# Altium PCB ePBR20_ACU_Power_rev0.PcbDoc (part 2 of 3)
Units mil, origin at the board's own origin, x right, y up, seen from the top; angles counter-clockwise.
Board outline 7475 x 3770 mil, 2 copper layers (Top Layer, Bottom Layer); 143 components, 136 nets, 557 pads, 1444 vias.
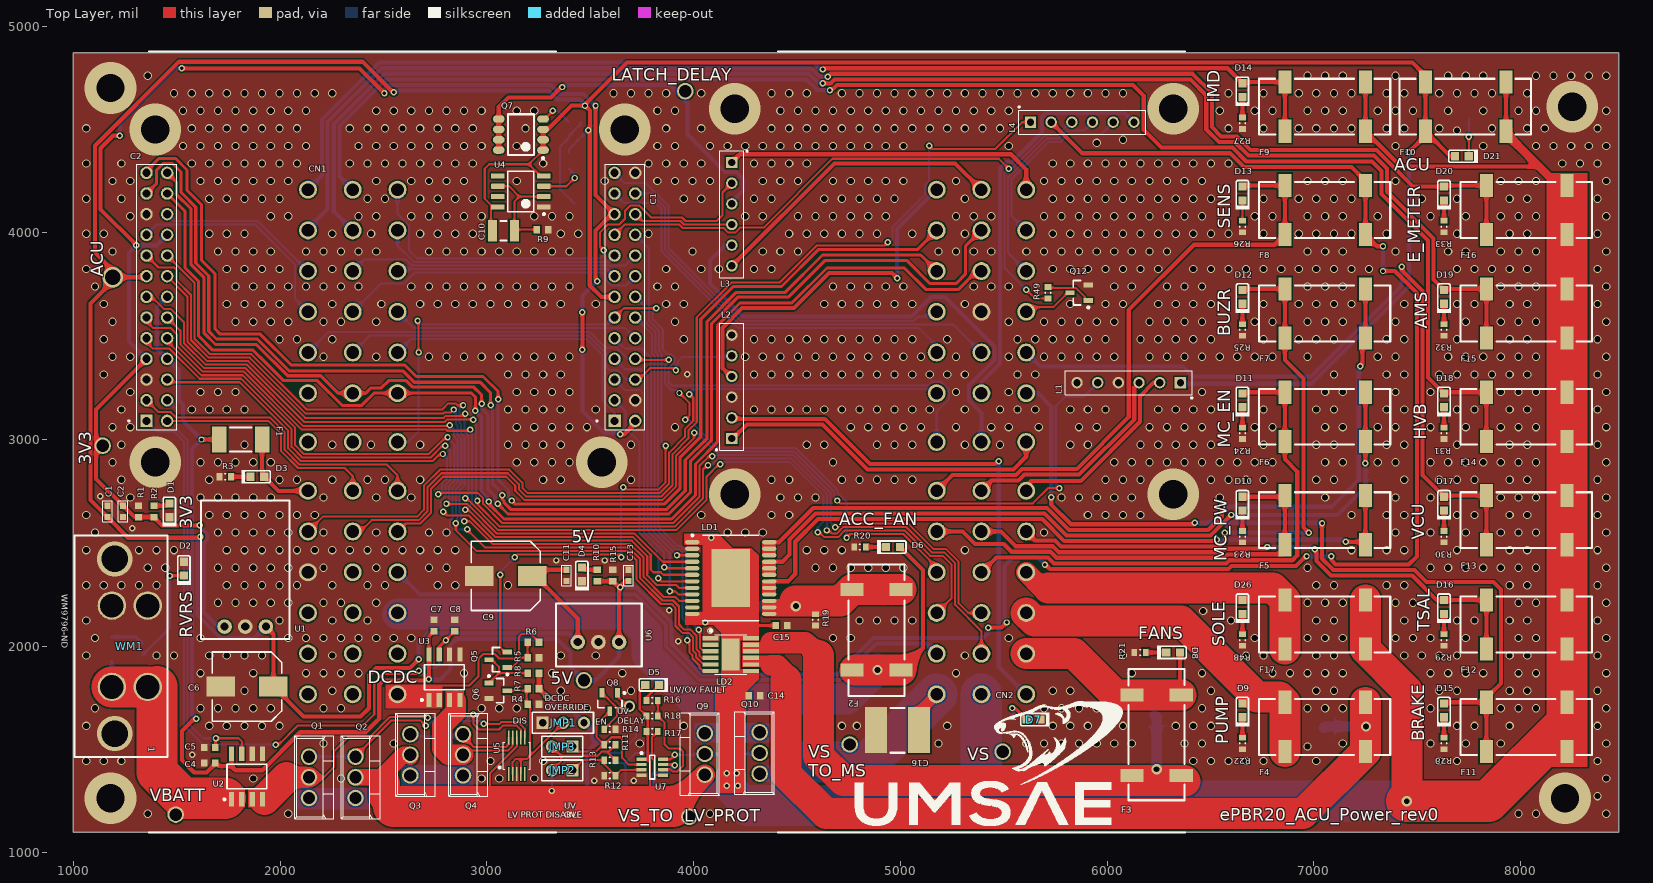
[diagram p0: Top Layer view]

## Part data (continued)
U7: library part CMP-0474-00861-1, "UV, OV and Reverse Supply Protection Controller, 2.5 to 34 V Vin, 8-pin SOT23 (TS8-8), -40 to 85 degC, Pb-Free, Mini Tape and Reel", Extended Temp="C, I, H", Manufacturer="Linear Technology", Power Good=no, Supplier Part Number 1=LTC4365ITS8#TRMPBFCT-ND, Active Limiting=no, Circuit Breakers(#)=1, Code_JEDEC=MO-193, ComponentLink1Description="Manufacturer URL", ComponentLink1URL=http://www.linear.com/, ComponentLink2Description=Datasheet, ComponentLink2URL=http://cds.linear.com/docs/en/datasheet/4365f.pdf, ComponentLink3Description="Package Specification", ComponentLink3URL=http://cds.linear.com/docs/en/packaging/SOT_8_05-08-1637.pdf, Fast Comparator=no, Fault=yes, Foldback=no, Mounting Technology="Surface Mount", PackageDescription="8-Pin Plastic TSOT-23, Body 2.9 x 1.63 mm, Pitch 0.65 mm", PackageReference=TS8-8, PackageVersion="Rev. A, 08/2010", Packing="Mini Tape and Reel", PartNumber=LTC4365ITS8#TRMPBF, Reset=no, RoHS=TRUE, Supplier 1=Digi-Key, Vin Range="2.5 to 34 V"
WM1: library part "Header 2", "Header, 2-Pin", LatestRevisionDate=17-Jul-2002, LatestRevisionNote="Re-released for DXP Platform.", Publisher="Altium Limited", Supplier 1=Digi-Key, Supplier 2=Digi-Key, Supplier Part Number 2=WM9796-ND

## Free pads (board coordinates)
  round 80 hole 60: 9(1142,2970) 9(1495,1185.95) 9(3470,1835) 9(3960,4685) 9(3980,1175) 9(4755,1525) 9(5495,1490)

## Via types
v1: diameter 40, hole 30, Top Layer to Bottom Layer, 1281 vias
v2: diameter 31, hole 17, Top Layer to Bottom Layer, 142 vias
v3: diameter 250, hole 137, Top Layer to Bottom Layer, 12 vias
v4: diameter 50, hole 28, Top Layer to Bottom Layer, 5 vias
v5: diameter 170, hole 128, Top Layer to Bottom Layer, 2 vias
v6: diameter 55, hole 35, Top Layer to Bottom Layer, 1 vias
v7: diameter 100, hole 75, Top Layer to Bottom Layer, 1 vias

## Nets (pads, with @x,y where several pads share a name; then routed paths per layer and width w, separated by ;. In a path a pad name is that pad's centre, name@x,y a point inside that pad or via, vN(x,y) a via of type N, cw(c..) or ccw(c..) an arc to the next point about the centre after c; other vN are vias at no path point)
3V3: C1.A11 C1.B1 C2.2 C2.A4 C2.B10 pad.9@1142,2970 R1.2 R2.1 U1.3 | length 7803.4
  Top Layer w20: v2(1225,4470) 1193.18,4470 1132,4408.82 1132,4113 v2(1305,3940) ; C2.A4@1355,3390 1110,3145 1110,2810.06 C2.2@1240,2680.06 1295.12,2624.94 R1.2@1315,2624.94 1315.06,2625 1389.94,2625 R2.1@1390,2624.94 1429.94,2585 v2(1611,2585) ; v2(1525,4795) 2385,4795 v2(2505,4675) ; v2(3462.4,3435) v2(3462.4,3615) ; v2(3526,4614) 3526,4182.02 C1.A11@3618.02,4090 3604.56,4090 3526,4011.44 3526,3774 v2(3535,3765) ; v2(3645,3025) 3665,3025 3718.02,3078.02 C1.B1@3718.02,3090
  Bottom Layer w20: v2(1225,4470) 1225,4529.82 1490.18,4795 v2(1525,4795) ; C2.A4@1354.02,3390 1270,3474.02 1270,3905 v2(1305,3940) 1404.02,3940 C2.B10@1454.02,3990 ; v2(1611,2585) 1611,2579.96 1647.5,2543.46 1647.5,2516.54 1628.5,2497.54 1628.5,2164.68 1698.18,2095 U1.3@1731.54,2095 ; v2(2505,4675) 2505,4695.45 2524.55,4715 3310,4715 3332.5,4692.5 3332.5,4691.54 3352.04,4672 3468,4672 v2(3526,4614) ; v2(3462.4,3435) 3462.4,3137.6 3568,3032 3638,3032 v2(3645,3025) ; v2(3462.4,3615) 3462.4,3697.29 3530.11,3765 v2(3535,3765)
3V3_ON: D1.1 R2.2 | length 79.6
  Top Layer w20: R2.2@1390,2680.06 1453.79,2680.06 D1.1@1465,2691.27
5V: C2.B4 C2.B7 C4.2 C7.2 C13.2 F1.1 F8.1 L4.2 pad.9@3470,1835 R10.1 R15.2 U2.8 U3.8 U6.3 | length 14284.5
  Top Layer w15: U3.8@2720,1960.24 2720,2047.44 C7.2@2745,2072.44
  Top Layer w20: v2@1581.59,1646.59 1525,1590 1525,1450 1585,1390 1645,1390 1687.56,1432.56 C4.2@1687.56,1435 1702.56,1420 1765,1420 ; v2(1620,3000) F1.1@1707.05,3000 ; U2.8@1765,1480.24 1765,1420 ; U3.8@2720,1960.24 v2(2720,1840) 2706.3,1840 2701.3,1835 2500,1835 2480,1815 2480,1650 2465,1635 2413.92,1583.92 2097.82,1583.92 1913.9,1400 1785,1400 1765,1420 ; R10.1@3535,2314.94 R15.2@3610,2314.94 v2@3640,2284.94 ; U6.3@3640,2020 v2@3640,2284.94 ; C13.2@3685,2315 3670.06,2315 v2@3640,2284.94 ; v2(5425,2090) 5490,2090 v2(5515,2115) ; v2(5700,2395) 5702.98,2395 5723.98,2374 6587.7,2374 6602.7,2389 6914.5,2389 6960.5,2435 v2(6965,2435) ; L4.2@5730,4535 5880,4385 6595.45,4385 6662.45,4318 7182,4318 7249.88,4250.12 F8.1@7249.88,4228.9 F8.1@7249.88,3991.1 7305.98,3935 v2(7335,3935) ; v2(7085,2435) 7085,2416.37 7105.83,2395.53 7459.53,2395.53 7499,2435 7499,3707.82 7391.82,3815 v2(7335,3815)
  Bottom Layer w20: C2.B4@1454.02,3390 1405,3439.02 1405,3640.98 C2.B7@1454.02,3690 ; C2.B4@1455,3390 1510,3335 1510,3190 1530,3170 1530,3090 v2(1620,3000) 1574.5,2954.5 1574.5,1670.5 v2(1595,1650) ; v2(2720,1840) 2775,1840 2825,1890 2825,2006.48 2854.52,2036 3339,2036 3405,1970 3405,1900 pad.9@3470,1835 3524.61,1835 3640,1950.39 U6.3@3640,2020 ; v2(3645,2285) 3723.29,2285 3894,2114.29 3894,2009.92 4039.92,1864 4695.71,1864 4871.27,2039.56 5399.56,2039.56 5425,2065 v2(5425,2090) ; v2(5515,2115) 5503.44,2126.56 5503.44,2388.44 5545,2430 5665,2430 v2(5700,2395) ; v2(6965,2435) v2(7085,2435) ; v2@7335,3814.77 v2(7335,3815) v2(7335,3935)
5V_ON: D4.1 R10.2 | length 79.6
  Top Layer w20: D4.1@3460,2381.27 3471.21,2370.06 R10.2@3535,2370.06
555_OUT: R41.1 U8.3 | length 244.7
  Bottom Layer w10: U8.3@3569.84,1484.65 U8.3@3585.2,1484.65 3645.87,1484.65 3720.98,1559.76 R41.1@3720.98,1622.2
555_OUT_LATCHING: Q11.1 R44.2 U4.3 | length 274
  Top Layer w10: U4.3@3276.22,4225 3385,4225 v2(3425,4265)
  Bottom Layer w10: Q11.1@3387.6,4229.29 3389.29,4229.29 v2(3425,4265) 3425,4282.44 R44.2@3397.44,4310
A\M\S\_\O\K\: CN1.3 L3.2 | length 2281.5
  Top Layer w10: v2(3565,3915.62) 3548,3932.62 3548,4002.33 3585.67,4040 3640,4040 3668.45,4068.45 3668.45,4106.32 3694.25,4132.12 3737.88,4132.12 3796,4074 3944.08,4074 3961.08,4057 4112,4057 4140,4085 4140,4195 L3.2@4185,4240
  Bottom Layer w10: CN1.3@2568.07,4208.47 2568.07,4091.93 2623.38,4036.62 2623.38,3915.62 2663,3876 3548,3876 3565,3893 v2(3565,3915.62)
ACC_FAN_CTRL: C1.A4 LD1.9 | length 1408.4
  Top Layer w10: C1.A4@3618.02,3390 C1.A4@3619,3390 ; v2(3885,2265.76) 3912.51,2265.76 3927,2251.26 LD1.9@3993.98,2251.26
  Bottom Layer w10: C1.A4@3618.02,3390 3668.02,3340 3745,3340 3777.13,3307.87 3777.13,3165.51 3777,3165.38 3777,3114.62 3777.13,3114.49 3777.13,2557.87 3885,2450 v2@3885,2253.39
ACC_FAN_FB: C2.B9 LD1.10 | length 3844.1
  Top Layer w10: C2.B9@1454.02,3890 1586,3758.02 1586,3488.25 1661.25,3413 1861.04,3413 2129.04,3145 2783.98,3145 2813.98,3175 2848.89,3175 2858.89,3165 v2(2885,3165) ; v2(2890,2605) 2917,2605 3028,2494 3694.08,2494 3759,2429.08 3759,2359.93 3758.91,2359.83 3758.91,2336.21 3856.86,2238.26 3911.74,2238.26 3930.24,2219.76 LD1.10@3993.98,2219.76
  Bottom Layer w10: v2(2885,3165) 2869.78,3165 2867.39,3167.39 2867.39,3156.5 2867.5,3156.39 2867.5,3082.5 2875.5,3074.5 2875.5,3029.87 2893.5,3011.87 2893.5,2778.5 2867.5,2752.5 2867.5,2648.61 2875,2641.11 2875,2620 v2(2890,2605)
ACC_FAN_FUSE: D24.2 F2.1 LD1.13 LD1.14 LD1.15 R19.2 | length 766.6
  Top Layer w150: 4490,2220 4711.22,2220 F2.1@4766.1,2274.88 F2.1@5003.9,2274.88
  Bottom Layer w50: D24.2@4265,2194.19 v4(4495,2194.19)
ACC_FAN_PWR: CN1.33 D6.1 F2.2 | length 3521.9
  Top Layer w20: D6.1@4998.46,2480 5110,2368.46 5110,1991.22 F2.2@5003.9,1885.12
  Top Layer w150: F2.2@4780,1885.12 F2.2@5003.9,1885.12
  Bottom Layer w150: CN1.33@2568.07,2155 3685,2155 3775,2065 3775,1960.62 3990.62,1745 4745,1745 v4@4890,1890
  other v4: 4890,1884.97
ACU_PWR: C1.2 C1.A7 C2.A8 C6.1 C9.1 C10.1 C11.2 D21.1 F10.2 L1.1 Q7.1 Q7.2 Q7.3 R43.2 R45.2 U1.1 U4.4 U4.8 U6.1 | length 17769.3
  Top Layer w10: C10.1@3026.85,4010 3020,4016.85 3020,4135 2990,4165 2990,4310 3011.36,4331.36 3203.64,4331.36 ; Q7.1@3272.28,4400 3203.64,4331.36 ; U4.4@3276.22,4275 3260,4275 3203.64,4331.36
  Top Layer w20: C2.A8@1355,3790 C2.A8@1354.02,3790 1349.02,3785 v7@1210,3785 ; v2(1615,2530) 1610,2525 1265,2525 C1.2@1165,2625 1083,2707 1083,3658 1190,3765 v7(1190,3785) v7@1210,3785 ; U1.1@1931.54,2095 1967.95,2058.58 C6.1@1967.95,1805 2112.95,1660 2390,1660 2430,1700 2430,1860.12 2464.88,1895 2628.31,1895 v2(2670,1936.69) ; v2(2550,4680) 2550,4675.96 2398.46,4827.5 1511.54,4827.5 1105,4420.96 1105,3905 1217.5,3792.5 v7@1210,3785 ; C10.1@3026.85,3978.15 C10.1@3026.85,4010 ; C9.1@3220,2340 C9.1@3235,2340 ; C9.1@3265,2375 C9.1@3270,2370 ; Q7.1@3272.28,4400 Q7.2@3272.28,4450 Q7.3@3272.28,4500 3295,4500 3410,4615 v2(3475,4615) 3499,4591 3499,4504 v2(3490,4495) 3498,4487 3498,3746.04 3554.04,3690 C1.A7@3618.02,3690 ; C11.2@3385,2370 C9.1@3270,2370 ; U6.1@3440,2020 3440,2135 C9.1@3235,2340 ; v2@3475,4620 3678,4823 7477,4823 7540.12,4759.88 F10.2@7540.12,4728.9 F10.2@7540.12,4491.1 ; v2(7460,4390) 7540.12,4470.12 F10.2@7540.12,4491.1 ; D21.1@7683.07,4370 7661.22,4370 F10.2@7540.12,4491.1 ; C9.1@3235,2340 3265,2370 C9.1@3270,2370
  Bottom Layer w10: R45.2@3397.44,4385 3397.44,4404.88 R43.2@3452.56,4460 3487.56,4495 v2(3490,4495)
  Bottom Layer w20: v2(1615,2530) 1601.5,2516.5 1601.5,2150.88 1712.38,2040 1876.54,2040 U1.1@1931.54,2095 ; v2(2550,4680) 2558,4688 3298.82,4688 3305.5,4681.32 3305.5,4680.35 3340.85,4645 3450,4645 v2@3475,4620 ; v2(2670,1936.69) 2670,2015 2718,2063 3397,2063 U6.1@3440,2020 ; L1.1@6355,3270 6990,3270 7460,3740 v2(7460,4390)
AIR+_CTRL: C1.B9 CN1.8 | length 1420.9
  Bottom Layer w10: CN1.8@2351.54,3814.77 2406.84,3870.08 2609.92,3870.08 2638,3842 3670.02,3842 C1.B9@3718.02,3890
AIR+_FB: C1.B5 CN1.12 | length 1202.9
  Bottom Layer w10: CN1.12@2568.07,3617.92 2645.99,3540 3668.02,3540 C1.B5@3718.02,3490
AIR-_CTRL: C1.B8 CN1.11 | length 1499.6
  Bottom Layer w10: CN1.11@2351.54,3617.92 2488.61,3755 2600,3755 2653,3808 3557,3808 3575.9,3789.1 3575.9,3772.55 3603.45,3745 3673.02,3745 C1.B8@3718.02,3790
AIR-_FB: C1.B4 CN1.13 CN2.12 | length 3875.1
  Top Layer w10: C1.B4@3719,3390 3724,3385 v2(3880,3385) ; v2(3932,3225) 3981.5,3175.5 3981.5,3116.5 v2(3960,3095) ; v2(4740,2525) 4757.24,2542.24 5015.8,2542.24 5175.98,2382.05 CN2.12@5175.98,2358.08
  Bottom Layer w10: CN1.13@2135,3421.07 2233.93,3520 3498,3520 3573,3445 3626.08,3445 3681.08,3390 C1.B4@3718.02,3390 ; v2(3880,3385) 3880,3375 3862.13,3357.13 3862.13,3268.82 3891.44,3239.52 3917.48,3239.52 v2(3932,3225) v2@3934.06,3222.95 ; v2(3960,3095) 3980,3095 4116.5,2958.5 4495.54,2958.5 4696,2758.04 4696,2742.89 4740,2698.89 v2(4740,2525)
AMS_CLR_ERR: C1.A8 CN1.9 | length 1068.7
  Bottom Layer w10: CN1.9@2568.07,3814.77 2578.3,3825 3583.02,3825 C1.A8@3618.02,3790
AMS_LED: CN2.37 L3.1 | length 1568.8
  Top Layer w20: L3.1@4185,4340 4225,4380 5535,4380 5609.06,4305.94 CN2.37@5609.06,4208.47
AMS_OK: C1.B11 L3.4 | length 486.7
  Top Layer w10: C1.B11@3719,4090 3752,4057 3937.04,4057 3954.04,4040 L3.4@4185,4040
AMS_PWR: CN1.5 D19.1 F15.2 | length 7208
  Top Layer w20: v2@4620.64,4718.14 v2(4625,4722.5) 4630.77,4728.27 4636.54,4722.5 4663.46,4722.5 4682.5,4741.54 4682.5,4742 6403,4742 6480,4665 6480,4500 6541,4439 6617.82,4439 6683.82,4373 7291.62,4373 7354.43,4310.18 7354.43,4198.75 7580,3973.18 7580,3773.46 D19.1@7630,3723.46 7635.43,3728.9 F15.2@7835.12,3728.9 F15.2@7835.12,3491.1
  Bottom Layer w20: CN1.5@2351.54,4011.62 2260,4103.16 2260,4526.82 2502.18,4769 4557.82,4769 4598.82,4728 4619.5,4728 v2(4625,4722.5)
B\R\A\K\E\_\P\R\E\S\S\: CN2.28 Q12.3 | length 249.8
  Top Layer w10: CN2.28@5609.06,3617.92 5631.13,3640 5739.88,3640 5809.88,3710 Q12.3@5820.71,3710
BRAKE_LIGHT_GND: CN2.23 L4.6 | length 1945.3
  Bottom Layer w20: CN2.23@5392.52,3224.22 5392.52,3277.35 5482,3366.83 5482,4312.96 5511.54,4342.5 5541.24,4342.5 5685,4486.26 5685,4559.04 5705.48,4579.52 6085.48,4579.52 L4.6@6130,4535
BRAKE_PRESS: C1.A10 L4.3 R49.1 | length 3287
  Top Layer w10: C1.A10@3618.02,3990 3668.02,4040 3930,4040 3947,4023 4146.11,4023 4168.63,4000.48 4201.37,4000.48 4225.89,4025 4338.89,4025 4671.89,4358 5477,4358 v2(5525,4310) ; v2(5609.06,3725) 5651.61,3682.44 R49.1@5715,3682.44
  Bottom Layer w10: C1.A10@3619,3990 C1.A10@3635,3990 ; v2(5609.06,3725) 5504,3830.06 5504,4289 v2(5525,4310) 5539.85,4310 5703.85,4474 5761,4474 5822,4535 L4.3@5830,4535
BRAKE_PWR: CN2.22 D15.1 F11.2 | length 4093.5
  Top Layer w20: v2(5730,2720) 5730,2686.55 5826.55,2590 6417.5,2590 v2(6425,2597.5) ; v2(7040,2595) 7040,2423.18 7094.65,2368.53 7487.73,2368.53 7546.26,2310 7870,2310 7905,2275 7905,1820 7835.12,1750.12 F11.2@7835.12,1728.9 ; D15.1@7630,1723.46 7635.43,1728.9 F11.2@7835.12,1728.9 ; F11.2@7835.12,1491.1 F11.2@7835.12,1728.9
  Bottom Layer w20: CN2.22@5609.06,3224.22 5665.78,3224.22 5730,3160 v2(5730,2720) ; v2(6425,2597.5) 7037.5,2597.5 v2(7040,2595)
BRAKE_SENS: CN2.31 L4.4 | length 1008.8
  Bottom Layer w10: CN2.31@5609.06,3814.77 5521,3902.83 5521,4267.11 5710.89,4457 5768.04,4457 5806.04,4495 5890,4495 L4.4@5930,4535
BRAKE_SW: CN2.34 L4.5 | length 883.8
  Bottom Layer w10: CN2.34@5609.06,4011.62 5538,4082.68 5538,4260.07 5717.93,4440 5775.08,4440 5813.08,4478 5973,4478 L4.5@6030,4535
BSPD_LED: CN2.39 L2.4 | length 1732
  Top Layer w20: L2.4@4185,3300 4140,3345 4140,3540.35 4235.15,3635.5 4485.5,3635.5 4655.5,3805.5 4959.5,3805.5 v2(4985,3780)
  Bottom Layer w20: v2(4985,3780) 4985,4017.49 CN2.39@5175.98,4208.47
BUZR_CTRL: C1.A5 LD1.3 | length 1297.3
  Top Layer w10: v2(3920,2440) 3920.24,2440.24 LD1.3@3993.98,2440.24
  Bottom Layer w10: C1.A5@3618.02,3490 3668.02,3440 3750,3440 3794.13,3395.87 3794.13,3158.47 3794,3158.34 3794,3121.66 3794.13,3121.53 3794.13,2565.87 v2(3920,2440)
BUZR_FB: C2.B5 LD1.4 | length 3334.3
  Top Layer w10: C2.B5@1449.94,3485.92 1454.02,3481.84 C2.B5@1454.02,3490 ; C2.B5@1454.02,3475.98 1619,3311 1818.79,3311 2073,3056.79 2073,2971.78 2114.78,2930 2720,2930 2800,3010 v2(2810,3010) ; v2(2805,2690) 2813,2690 2814,2691 2817.5,2687.5 2906.39,2687.5 2916.89,2677 2917.12,2677 3049.12,2545 3715.21,2545 3851.47,2408.74 LD1.4@3993.98,2408.74
  Bottom Layer w10: v2(2805,2690) 2816.5,2701.5 2816.5,2773.62 2842.5,2799.62 2842.5,2977.5 v2(2810,3010)
BUZR_FUSE: F7.1 LD1.22 LD1.23 LD1.24 R36.1 | length 4029.6
  Top Layer w20: LD1.24@4366.02,2503.23 4413.23,2503.23 4579.24,2669.24 5709.13,2669.24 5815.37,2563 6489.82,2563 6555,2628.18 v2(6555,2675) ; v2(7225,3355) 7235,3365 7235,3476.22 F7.1@7249.88,3491.1 F7.1@7249.88,3728.9
  Bottom Layer w20: v2(6555,2675) 7088.1,2675 7217.5,2804.4 7217.5,3347.5 v2(7225,3355)
BUZR_PWR: CN2.13 D12.1 F7.2 | length 2882.2
  Top Layer w20: CN2.13@5609.06,2554.93 5652.98,2511 5748.55,2511 5777.55,2482 6542.96,2482 6570,2509.04 v2(6570,2550) ; D12.1@6655,3723.46 6660.43,3728.9 F7.2@6860.12,3728.9 F7.2@6860.12,3491.1 6860.12,3384.88 6950,3295 6950,2575 v2(6975,2550)
  Bottom Layer w20: v2(6570,2550) v2(6975,2550)
CAN_N: C2.A13 CN2.36 | length 6159.5
  Top Layer w15: C2.A13@1354.02,4290 1354.02,4299.02 1414,4359 1495,4359 1550,4304 1550,4205.5 1620,4135.5 1620,3867.44 1685,3802.44 1685,3535 1710,3510 1905,3510 2055,3360 2604.11,3360 2659.11,3305 2982,3305 3055,3232 v2(3055,3195) ; v2(3120,2705) 3137.79,2687.21 3857.71,2687.21 3935.5,2765 3935.5,2914.58 4035,3014.08 4035,3582.42 4192.58,3740 4425.54,3740 4605.54,3920 5084.36,3920 CN2.36@5175.98,4011.62
  Bottom Layer w15: v2(3055,3195) 3055,2805.67 3105,2755.67 3105,2720 v2(3120,2705)
CAN_P: C2.A12 CN2.33 | length 6261.5
  Top Layer w15: C2.A12@1354.02,4190 1403.03,4239.02 1403.03,4303.66 1434.37,4335 1480,4335 1520.63,4294.37 1520.63,4195.48 1592,4124.11 1592,3854.11 1654.98,3791.13 1654.98,3523.57 1692.63,3485.92 1890.19,3485.92 2045.55,3330.56 2595.55,3330.56 2649.11,3277 2968,3277 3017.5,3227.5 3017.5,3173.61 v2@3023.17,3167.95 ; CN2.33@5175.98,3814.77 5098.5,3892.25 4623.71,3892.25 4443.46,3712 4207,3712 4065.56,3570.56 4065.56,3006.67 3960,2901.11 3960,2751.5 3870.5,2662 3115.4,2662 3083.78,2693.62 3083.78,2702.43 3075,2711.21 v2(3075,2730.5) ; v2(3075,2730.5) 3075,2738.56 3079.03,2734.53 3083.06,2730.5 v2(3075,2730.5)
  Bottom Layer w15: v2@3015,3166.39 v2@3016.39,3165 ; v2@3024,3157.39 v2@3020,3161.39 ; v2(3075,2730.5) 3075,2740 3027,2788 3027,3148 3020,3155 v2@3020,3161.39 ; v2@3016.39,3165 v2@3020,3161.39 ; v2@3016.39,3165 v2(3020,3165) v2@3020,3161.39
CAN_SENS_N: C2.B13 CN1.17 CN2.35 | length 6438.8
  Top Layer w15: C2.B13@1454.02,4290 1498.63,4245.38 1498.63,4186.37 1570,4115 1570,3845 1632.98,3782.02 1632.98,3514.46 1687.44,3460 1885,3460 2036.44,3308.56 2196.44,3308.56 2280.78,3224.22 CN1.17@2351.54,3224.22 2414.22,3224.22 2440,3250 2490,3250 2525,3285 2610,3285 2640,3255 2935,3255 2975,3215 v2(2975,3172.42) ; v2@3053.78,2688.62 3102.4,2640 3880.42,2640 3984.97,2744.56 3984.97,2894.97 4087.56,2997.56 4087.56,3561.45 4216.11,3690 4460,3690 4635,3865 5033,3865 5143,3755 5270,3755 5315,3800 5315,3934.1 CN2.35@5392.52,4011.62
  Bottom Layer w15: v2(2975,3172.42) 2975,3150.25 3005,3120.25 3005,2760 3040,2725 3040,2703.78 v2(3053.78,2690)
CAN_SENS_P: C2.B12 CN1.18 CN2.32 | length 6220.2
  Top Layer w15: C2.B12@1454.02,4190 1540,4104.02 1540,3831.59 1605.5,3766.09 1605.5,3502.18 1675.18,3432.5 1869.12,3432.5 1905.62,3396 1906.58,3396 2017.58,3285 2180,3285 2300,3165 2395,3165 2454.22,3224.22 CN1.18@2568.07,3224.22 2925.78,3224.22 2945,3205 v2(2945,3140) ; v2(3010,2700) 3010,2688.62 3083.12,2615.5 3894.34,2615.5 4009.5,2730.66 4009.5,2881.93 4115,2987.43 4115,3550 4225,3660 4475.35,3660 4645.35,3830 5020,3830 5125,3725 5280,3725 5369.77,3814.77 CN2.32@5392.52,3814.77
  Bottom Layer w15: v2(2945,3140) 2975,3110 2975,2745 3010,2710 v2(3010,2700)
CHASSIS_GND: CN1.25 CN2.24 | length 3736.3
  Top Layer w10: CN1.25@2135,2554.93 2207.31,2627.24 2663.26,2627.24 2696,2659.98 2696,2776.12 2773.88,2854 3109.08,2854 3171.79,2791.29 3171.79,2766.29 3197.38,2740.71 3835.55,2740.71 3882,2787.16 3882,2936.74 3958.06,3012.8 3958.06,3050.43 3998.5,3090.87 3998.5,3201.37 v2(3980,3219.87)
  Bottom Layer w10: v2(3980,3219.87) 4004.65,3244.52 5142.11,3244.52 5147.59,3250 5165.21,3250 5165.21,3235 CN2.24@5175.98,3224.22
COOL_SYS_TEMP1: C2.A7 CN2.5 | length 5705
  Top Layer w10: C2.A7@1354.02,3690 1380,3690 1437.88,3632.12 1471.46,3632.12 1535,3568.58 1535,3467.12 1640.12,3362 1839.92,3362 2116.92,3085 2796.11,3085 2808.61,3097.5 v2@2921.44,3097.5 ; 2955,2687.21 3063.21,2579 3909.46,2579 4046,2715.54 4046,2854.85 4070,2878.85 v2(4070,2875) ; v2(4645,2560) 4645,2571.39 4650.7,2565.7 4671.39,2545 4692.65,2545 4712.5,2564.85 4712.5,2565.43 4723.3,2576.24 5029.88,2576.24 5152.11,2454 5212.65,2454 5265.29,2401.36 5265.29,2200.82 5392.52,2073.59 CN2.5@5392.52,1964.38
  Bottom Layer w10: v2(2935,3095) 2935,3091.5 2947.5,3079 2947.5,2718.28 2955,2710.78 v2(2955,2704.5) ; v2(4070,2875) 4085,2875 4117.5,2907.5 4474.42,2907.5 4645,2736.92 v2(4645,2560)
COOL_SYS_TEMP2: C2.B3 CN2.8 | length 5250.5
  Top Layer w10: C2.B3@1454.02,3290 1467.02,3277 1804.71,3277 2039,3042.71 2039,2957.7 2100.7,2896 2739,2896 2773,2930 v2(2788.03,2930) ; v2(2765,2735) 2772.5,2742.5 2955.89,2742.5 2982.5,2715.89 2982.5,2688.54 3075.04,2596 3902.42,2596 4029,2722.58 4029,2873.79 4075.21,2920 v2(4090,2920) ; v2(4685,2576.24) 4699.26,2576.24 4716.26,2593.24 5037.74,2593.24 5159.97,2471 5219.7,2471 5282.29,2408.4 5282.29,2207.86 5328.92,2161.23 CN2.8@5392.52,2161.23
  Bottom Layer w10: v2(2765,2735) 2782.5,2752.5 2782.5,2787.71 2808.5,2813.71 2808.5,2909.53 v2(2788.03,2930) ; v2(4090,2920) 4095.5,2920 v2@4100,2924.5 ; v2@4096.57,2924.5 v2@4100,2924.5 ; v2(4685,2576.24) 4662,2599.24 4662,2743.96 4481.46,2924.5 v2@4100,2924.5
COOL_SYS_TEMP3: C2.B8 CN2.9 | length 5555.4
  Top Layer w10: C2.B8@1454.02,3790 1552,3692.02 1552,3474.17 1647.17,3379 1846.96,3379 2120.96,3105 2792.07,3105 2801.57,3114.5 2885.5,3114.5 2895,3124 v2(2895,3125) ; v2(2895,2715) 2903.17,2715 3056.17,2562 3916.5,2562 4063,2708.5 4063,2821.04 4121.96,2880 v2(4130,2880) ; v2(4600,2552.14) 4607.79,2552.14 4631.93,2528 4699.7,2528 4729.5,2557.8 4729.5,2558.39 4730.35,2559.24 5022.84,2559.24 5145.07,2437 5205.61,2437 5248.29,2394.32 5248.29,2233.54 CN2.9@5175.98,2161.23
  Bottom Layer w10: v2@2892.5,3125 2892.5,3036.92 2910.5,3018.92 2910.5,2730.5 v2(2895,2715) ; v2(4130,2880) 4123.43,2880 4133.93,2890.5 4467.38,2890.5 4628,2729.88 4628,2601.89 4600,2573.89 v2(4600,2552.14)